# Altium PCB DB30.PcbDoc (part 7 of 8)
Units mil, origin at the board's own origin, x right, y up, seen from the top; angles counter-clockwise.
Board outline 3236.22 x 4456.69 mil, 8 copper layers (Top Layer, MidLayer1, MidLayer2, GND-Layer5, MidLayer3, VCC, MidLayer4, Bottom Layer), stack 61.8 mil thick; 219 components, 472 nets, 1811 pads, 1561 vias.
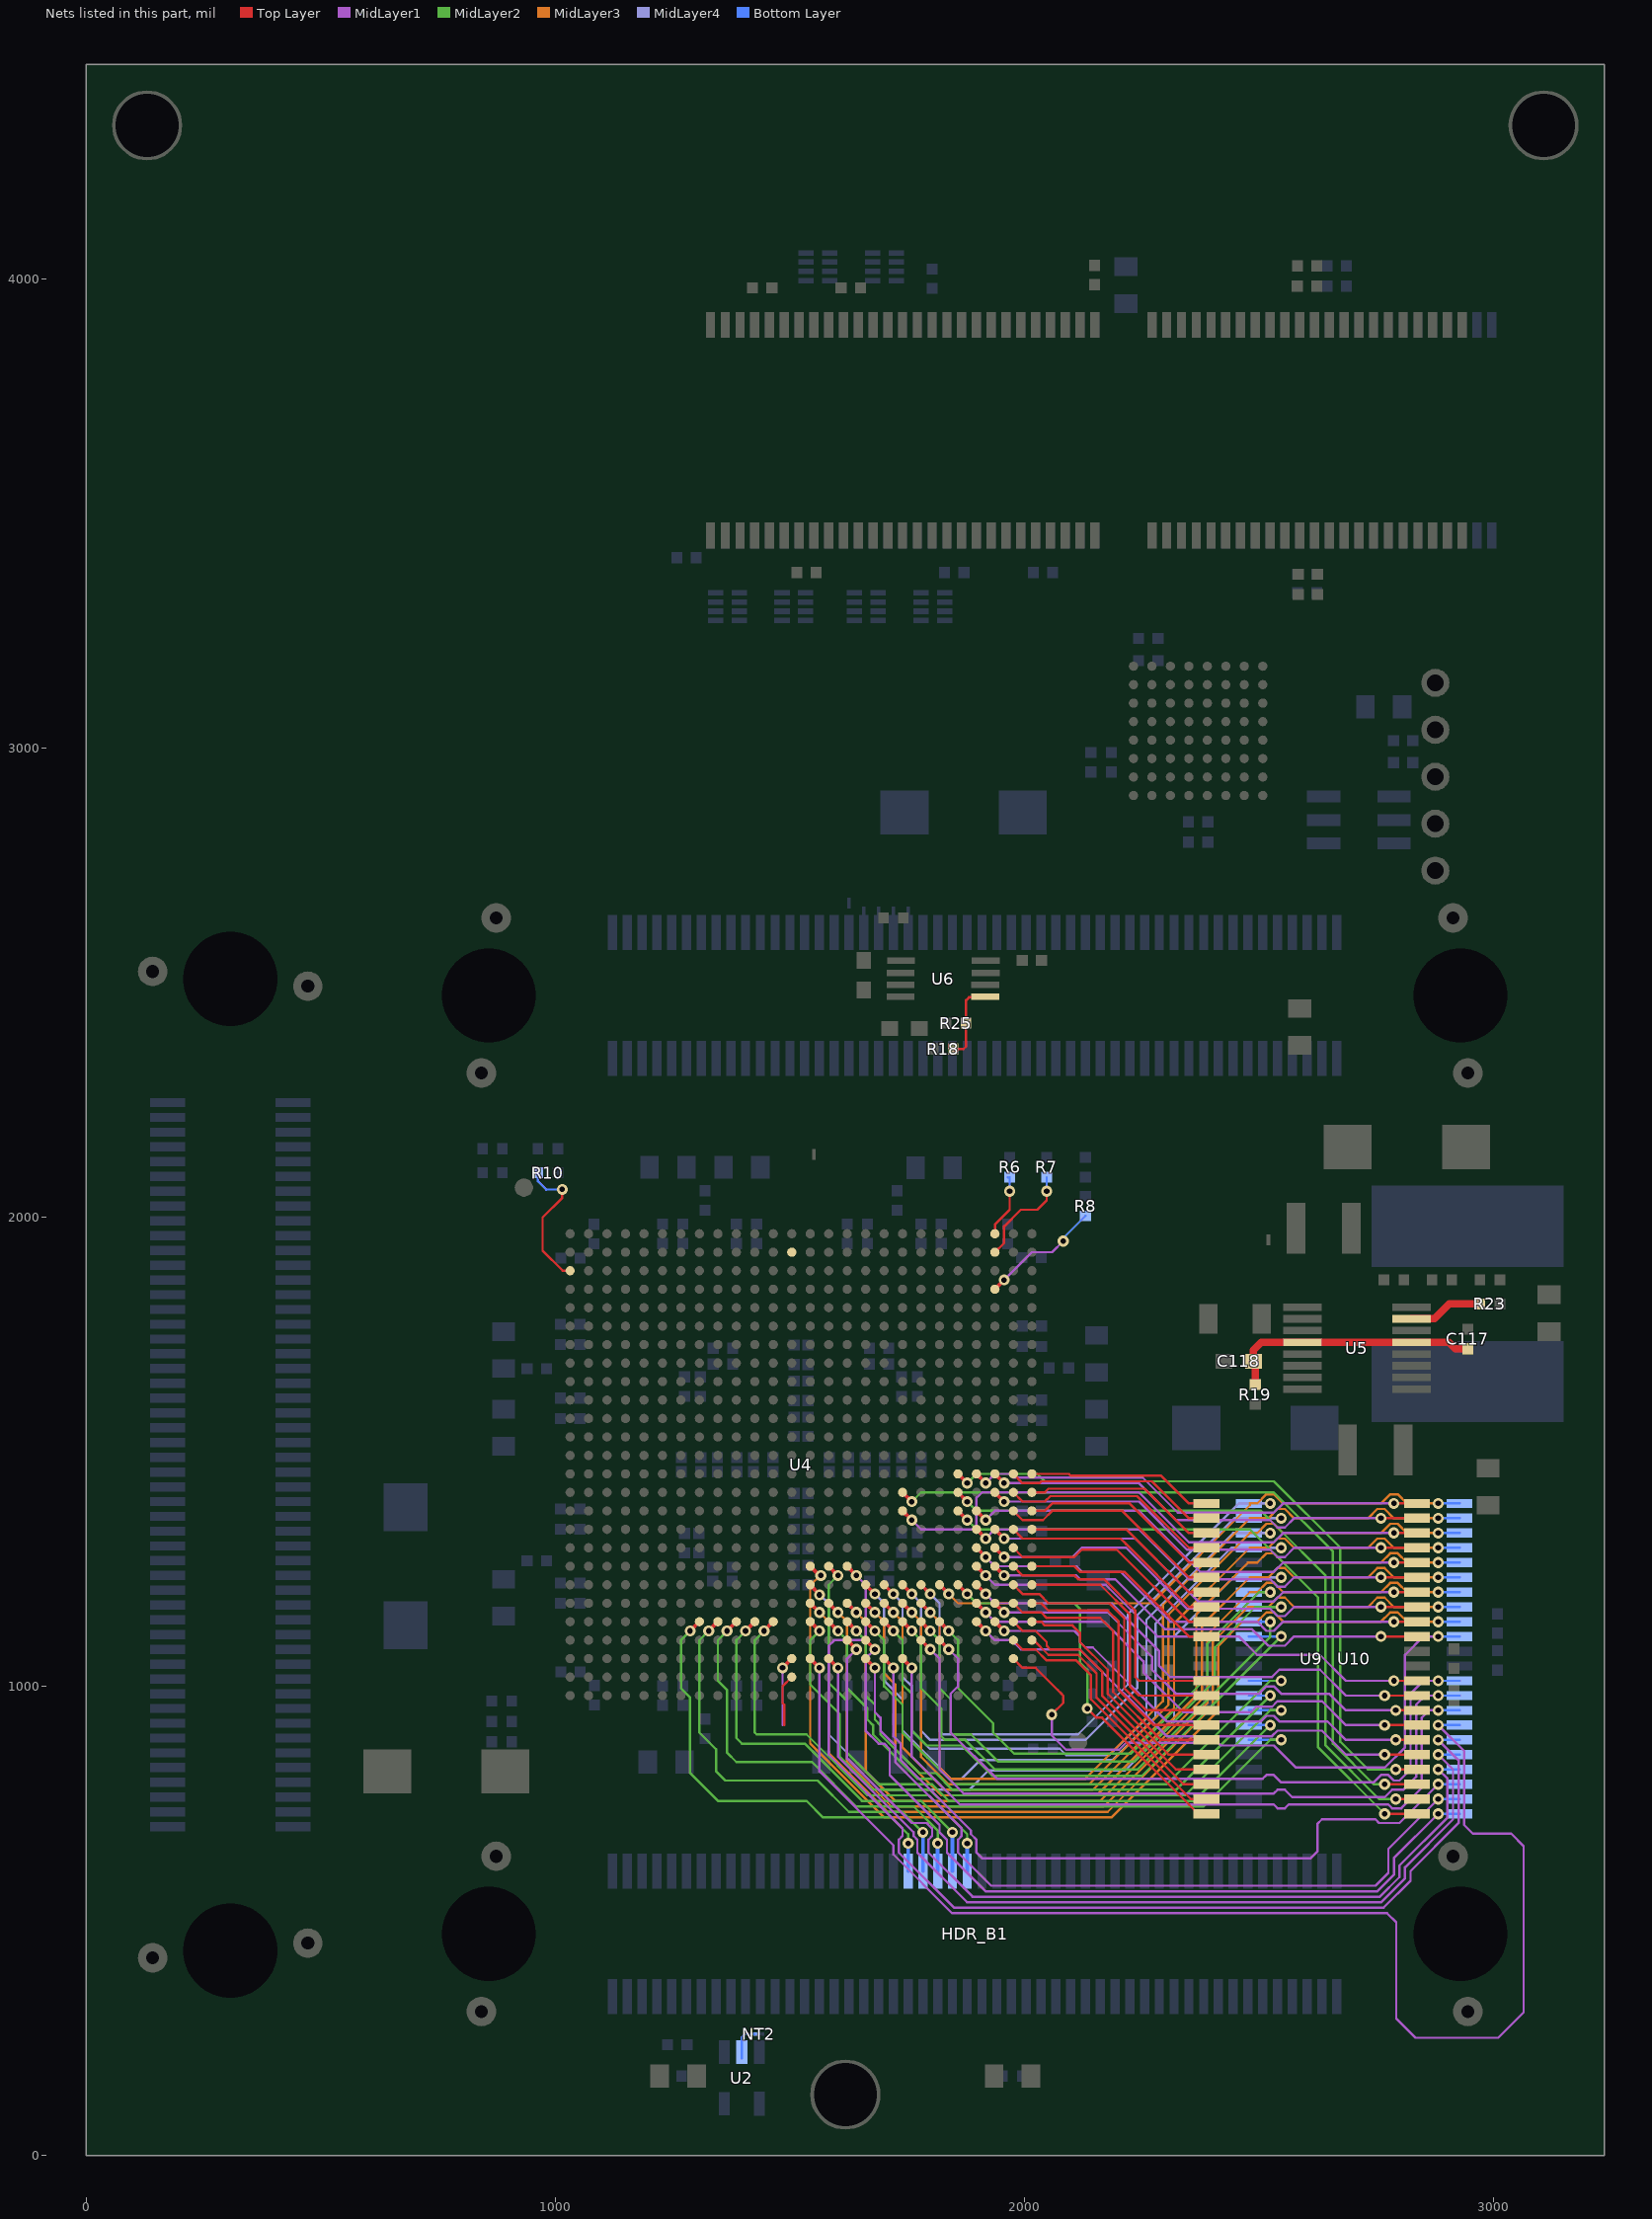
[diagram p13: the nets of this part, all layers, seen from the top]

## Via types
v1: diameter 23.62, hole 11.81, Top Layer to Bottom Layer, 944 vias
v2: diameter 23.62, hole 11.81, Top Layer to Bottom Layer, tented both sides, 477 vias
v3: diameter 27.56, hole 15.75, Top Layer to Bottom Layer, 139 vias
v4: diameter 23.62, hole 11.81, Top Layer to Bottom Layer, tented top, 1 vias

## Nets (pads, with @x,y where several pads share a name; then routed paths per layer and width w, separated by ;. In a path a pad name is that pad's centre, name@x,y a point inside that pad or via, vN(x,y) a via of type N, cw(c..) or ccw(c..) an arc to the next point about the centre after c; other vN are vias at no path point) (continued)
SRAM1_A6: U4.Y17 U10.19 | length 1586.2
  Top Layer w7.87: U4.Y17@1661.42,1216.54 v1(1681.1,1196.85)
  MidLayer4 w5: v1(1681.1,1196.85) 1700.79,1177.16 1700.79,1011.81 1740.16,972.44 1740.16,917.32 1740.16,905.51 1842.52,803.15 1866.14,803.15 1905.51,842.52 2187.01,842.52 2279.53,935.04 2279.53,1133.86 2440.94,1295.28 v1(2547.24,1295.28)
  Bottom Layer w5: U10.19@2478.44,1295.27 v1(2547.24,1295.28) v1@2551.18,1295.28
SRAM1_A7: U4.Y18 U10.20 | length 1489.3
  Top Layer w7.87: U4.Y18@1700.79,1216.54 v1(1720.47,1196.85)
  MidLayer4 w5: v1(1720.47,1196.85) 1740.16,1177.16 1740.16,1019.69 1759.84,1000 1759.84,917.32 1759.84,905.51 1798.23,867.13 2075.05,867.13 2088.83,853.35 2181.1,853.35 2259.84,932.09 2259.84,1141.73 2444.88,1326.77 2456.69,1326.77 v1(2523.83,1326.76)
  Bottom Layer w5: U10.20@2478.44,1326.76 v1@2527.77,1326.76
SRAM1_A8: U4.Y19 U10.21 | length 1468.5
  Top Layer w7.87: U4.Y19@1740.16,1216.54 v1(1759.84,1196.85)
  MidLayer4 w5: v1(1759.84,1196.85) 1779.53,1177.16 1779.53,917.32 1779.53,905.51 1799.21,885.83 2129.92,885.83 2240.16,996.06 2240.16,1151.21 2447.21,1358.27 v1(2547.24,1358.27)
  Bottom Layer w5: U10.21@2472.44,1358.27 U10.21@2478.44,1358.26 v1(2547.24,1358.27) v1@2551.18,1358.27
SRAM1_A9: U4.Y20 U10.22 | length 1372.4
  Top Layer w7.87: U4.Y20@1779.53,1216.54 v1(1799.21,1196.85)
  MidLayer4 w5: v1(1799.21,1196.85) 1818.9,1177.16 1818.9,917.32 1818.9,905.51 1826.77,897.64 2114.17,897.64 2220.47,1003.94 2220.47,1153.54 2456.68,1389.75 v1(2523.83,1389.75)
  Bottom Layer w5: U10.22@2478.44,1389.75 v1(2523.83,1389.75)
SRAM1_A10: U4.Y21 U10.23 | length 1247.9
  Top Layer w7.87: U4.Y21@1818.9,1216.54 v1(1838.58,1196.85)
  MidLayer3 w5: v1(1838.58,1196.85) 1858.27,1177.16 2078.74,1177.17 2094.49,1177.17 2271.65,1177.17 2480.33,1385.84 2480.33,1389.75 2496.27,1389.75 2515.96,1409.44 2531.7,1409.44 2551.38,1389.76 ; 2551.18,1389.76 2551.38,1389.76 ; v1(2881.9,1389.75) 2814.97,1389.75 2795.28,1409.45 2779.53,1409.45 2759.84,1389.76 2551.38,1389.76
  Bottom Layer w5: v1(2881.9,1389.75) U10.23@2927.25,1389.75
SRAM1_A11: U4.AA20 U10.24 | length 1867.3
  Top Layer w7.87: U4.AA20@1779.53,1177.17 v1(1799.21,1157.48)
  MidLayer3 w5: v1(1799.21,1157.48) 1818.9,1137.79 1818.9,917.32 1818.9,905.51 1818.9,826.77 1842.52,803.15 2129.92,803.15 2295.28,968.5 2295.28,1173.23 2480.31,1358.27 2519.69,1358.27 2539.37,1377.95 2555.12,1377.95 2574.8,1358.27 2732.28,1358.27 2751.97,1377.95 2767.72,1377.95 2787.41,1358.26 v1(2881.9,1358.26)
  Bottom Layer w5: v1(2881.9,1358.26) U10.24@2927.25,1358.26
SRAM1_A12: U4.AA19 U10.25 | length 1883.2
  Top Layer w7.87: U4.AA19@1740.16,1177.17 v1(1759.84,1157.48)
  MidLayer3 w5: v1(1759.84,1157.48) 1779.53,1137.79 1779.53,917.32 1779.53,905.51 1779.53,849.41 1837.6,791.34 2137.8,791.34 2307.09,960.63 2307.09,1153.52 2480.33,1326.76 2496.27,1326.76 2515.96,1346.45 2531.7,1346.45 2551.38,1326.77 2759.84,1326.77 2779.53,1346.46 2795.28,1346.46 2814.97,1326.76 v1(2881.9,1326.76)
  Bottom Layer w5: v1(2881.9,1326.76) U10.25@2927.25,1326.76
SRAM1_A13: U4.AA18 U10.26 | length 1900.3
  Top Layer w7.87: U4.AA18@1700.79,1177.17 v1(1720.47,1157.48)
  MidLayer3 w5: v1(1720.47,1157.48) 1740.16,1137.79 1740.16,917.32 1740.16,905.51 1740.16,870.08 1830.71,779.53 2145.67,779.53 2318.9,952.76 2318.9,1133.86 2480.31,1295.28 2519.69,1295.28 2539.37,1314.96 2555.12,1314.96 2574.8,1295.28 2732.28,1295.28 2751.97,1314.96 2767.72,1314.96 2787.41,1295.27 v1(2881.9,1295.27)
  Bottom Layer w5: v1(2881.9,1295.27) U10.26@2927.25,1295.27
SRAM1_A14: U4.AA17 U10.27 | length 1920.3
  Top Layer w7.87: U4.AA17@1661.42,1177.17 v1(1681.1,1157.48)
  MidLayer3 w5: v1(1681.1,1157.48) 1700.79,1137.79 1700.79,1027.56 1724.41,1003.94 1724.41,917.32 1724.41,905.51 1724.41,866.14 1822.83,767.72 2153.54,767.72 2366.14,980.31 2366.14,1153.54 2476.37,1263.77 2496.27,1263.77 2515.96,1283.45 2531.7,1283.45 2551.38,1263.78 2759.84,1263.78 2779.53,1283.46 2795.28,1283.46 2814.97,1263.77 v1(2881.9,1263.77)
  Bottom Layer w5: v1(2881.9,1263.77) U10.27@2927.25,1263.77
SRAM1_A15: U4.AD18 U10.42 | length 1635.8
  Top Layer w7.87: U4.AD18@1700.79,1059.05 v1(1720.47,1039.37)
  MidLayer1 w5: v1(1720.47,1039.37) 1720.47,917.32 1720.47,905.51 1720.47,893.7 1736.22,877.95 1736.22,842.52 1885.83,692.91 1885.83,685.04 1897.64,673.23 1897.64,645.67 1909.45,633.86 2610.24,633.86 2624.26,647.88 2624.26,706.94 2633.86,716.54 2748.03,716.54 2755.91,708.66 2799.21,708.66 v1(2881.9,791.33)
  Bottom Layer w5: v1(2881.9,791.33) U10.42@2927.25,791.33
SRAM1_A16: U4.AD17 U10.43 | length 1706.2
  Top Layer w7.87: U4.AD17@1661.42,1059.05 v1(1681.1,1039.37)
  MidLayer1 w5: v1(1681.1,1039.37) 1681.1,944.88 1692.91,933.07 1692.91,917.32 1692.91,905.51 1724.41,874.02 1724.41,838.58 1866.14,696.85 1866.14,681.1 1858.27,673.23 1858.27,645.67 1928.89,575.05 2748.28,575.05 2775.59,602.36 2775.59,653.54 v1(2881.9,759.83)
  Bottom Layer w5: v1(2881.9,759.83) U10.43@2927.25,759.83
SRAM1_A17: U4.AC17 U10.44 | length 1763.6
  Top Layer w7.87: U4.AC17@1661.42,1098.43 v1(1681.1,1078.74)
  MidLayer1 w5: v1(1681.1,1078.74) 1661.42,1059.05 1661.42,917.32 1661.42,905.51 1688.98,877.95 1700.79,877.95 1712.6,866.14 1712.6,811.02 1818.9,704.72 1818.9,688.98 1834.65,673.23 1834.65,645.67 1917.08,563.24 2752.21,563.24 2787.4,598.43 2787.4,633.86 v1(2881.9,728.34)
  Bottom Layer w5: v1(2881.9,728.34) U10.44@2927.25,728.34
SRAM1_A18: U4.AA16 U10.28 | length 1988.7
  Top Layer w7.87: U4.AA16@1622.05,1177.17 v1(1641.73,1157.48)
  MidLayer3 w5: v1(1641.73,1157.48) 1661.42,1137.79 1661.42,917.32 1661.42,905.51 1661.42,818.9 1724.41,755.91 2161.42,755.91 2377.95,972.44 2377.95,1129.92 2480.31,1232.28 2519.69,1232.28 2539.37,1251.97 2555.12,1251.97 2574.8,1232.28 2732.28,1232.28 2751.97,1251.97 2767.72,1251.97 2787.41,1232.28 v1(2881.9,1232.27)
  Bottom Layer w5: v1(2881.9,1232.27) U10.28@2927.25,1232.27
SRAM1_D0: U4.W15 U10.7 | length 1490.6
  Top Layer w7.87: U4.W15@1582.68,1255.91 v1(1602.36,1236.22)
  MidLayer2 w5: v1(1602.36,1236.22) 1582.68,1216.54 1582.68,1019.68 1582.68,1007.87 1622.05,968.5 1622.05,917.32 1622.05,905.51 1622.05,858.27 1688.98,791.34 1803.15,791.34 1838.58,755.91 2362.2,755.91 2523.6,917.3 v1(2523.83,917.3)
  Bottom Layer w5: U10.7@2478.44,917.31 v1(2523.83,917.3) v1@2527.77,917.3
SRAM1_D1: U4.AB15 U10.8 | length 1351
  Top Layer w7.87: U4.AB15@1582.68,1137.8 v1(1602.36,1118.11)
  MidLayer2 w5: v1(1602.36,1118.11) 1622.05,1098.42 1622.05,996.06 1665.35,952.76 1665.35,929.13 1677.17,917.32 1677.17,905.51 1677.17,897.64 1771.65,803.15 1807.09,803.15 1834.65,775.59 1842.52,767.72 2342.52,767.72 2523.62,948.82 v1(2547.24,948.82)
  Bottom Layer w5: U10.8@2478.44,948.81 v1(2547.24,948.82) v1@2551.18,948.82
SRAM1_D2: U4.AB16 U10.9 | length 1282.1
  Top Layer w7.87: U4.AB16@1622.05,1137.8 v1(1641.73,1118.11)
  MidLayer2 w5: v1(1641.73,1118.11) 1661.42,1098.42 1661.42,980.32 1681.1,960.63 1681.1,929.13 1692.91,917.32 1692.91,905.51 1692.91,897.64 1775.59,814.96 1811.02,814.96 1846.46,779.53 2323.05,779.53 v1(2523.83,980.31) v1@2523.61,980.31
  Bottom Layer w5: U10.9@2478.44,980.31 v1(2523.83,980.31) v1@2527.77,980.31
SRAM1_D3: U4.AB17 U10.10 | length 1285.7
  Top Layer w7.87: U4.AB17@1661.42,1137.8 v1(1681.1,1118.11)
  MidLayer2 w5: v1(1681.1,1118.11) 1700.79,1098.42 1700.79,1000 1740.16,960.63 1740.16,917.32 1740.16,905.51 1740.16,901.57 1850.39,791.34 2303.15,791.34 2523.62,1011.81 v1(2547.24,1011.81)
  Bottom Layer w5: U10.10@2478.44,1011.8 v1(2547.24,1011.81) v1@2551.18,1011.81
SRAM1_D4: U4.AB18 U10.13 | length 1280
  Top Layer w7.87: U4.AB18@1700.79,1137.8 v1(1720.47,1118.11)
  MidLayer2 w5: v1(1720.47,1118.11) 1740.16,1098.42 1740.16,1003.94 1759.84,984.25 1759.84,917.32 1759.84,905.51 1791.34,874.02 1866.14,874.02 1931.1,809.06 2250,809.06 v1(2547.24,1106.3)
  Bottom Layer w5: U10.13@2478.44,1106.29 v1(2547.24,1106.3) v1@2551.18,1106.3
SRAM1_D5: U4.AB19 U10.14 | length 1207.4
  Top Layer w7.87: U4.AB19@1740.16,1137.8 v1(1759.84,1118.11)
  MidLayer2 w5: v1(1759.84,1118.11) 1779.53,1098.42 1779.53,996.06 1822.83,952.76 1822.83,917.32 1822.83,905.51 1822.83,893.7 1830.71,885.83 1874.02,885.83 1937.01,822.83 2241.14,822.83 2523.83,1105.52 v1(2523.83,1137.79)
  Bottom Layer w5: U10.14@2478.44,1137.79 v1@2527.77,1137.79
SRAM1_D6: U4.AB20 U10.15 | length 1243.6
  Top Layer w7.87: U4.AB20@1779.53,1137.8 v1(1799.21,1118.11)
  MidLayer2 w5: v1(1799.21,1118.11) 1818.9,1098.42 1818.9,996.06 1842.52,972.44 1842.52,917.32 1842.52,905.51 1842.52,901.57 1846.46,897.64 1885.83,897.64 1905.51,877.95 1943.9,839.57 2233.27,839.57 2405.51,1011.81 2405.51,1082.68 2492.13,1169.29 v1(2547.24,1169.29)
  Bottom Layer w5: U10.15@2478.44,1169.28 v1(2547.24,1169.29) v1@2551.18,1169.29
SRAM1_D7: U4.AB21 U10.16 | length 1126.6
  Top Layer w7.87: U4.AB21@1818.9,1137.8 v1(1838.58,1118.11)
  MidLayer2 w5: v1(1838.58,1118.11) 1858.27,1098.42 1858.27,996.06 1933.07,921.26 1933.07,917.32 1933.07,905.51 1933.07,901.57 1978.35,856.3 2226.38,856.3 2389.76,1019.69 2389.76,1090.55 2500,1200.79 v1@2523.83,1200.79
  Bottom Layer w5: U10.16@2478.44,1200.78 v1@2527.77,1200.78
  other v1: 2523.83,1200.78
SRAM1_D8: U4.AA15 U10.29 | length 2006.3
  Top Layer w7.87: U4.AA15@1582.68,1177.17 v1(1602.36,1157.48)
  MidLayer3 w5: v1(1602.36,1157.48) 1622.05,1137.79 1622.05,917.32 1622.05,905.51 1622.05,838.58 1716.54,744.09 2169.29,744.09 2389.76,964.57 2389.76,1110.24 2480.3,1200.78 2496.27,1200.78 2515.96,1220.46 2531.7,1220.46 2551.38,1200.79 2759.84,1200.79 2779.53,1220.47 2795.28,1220.47 2814.97,1200.78 v1(2881.9,1200.78)
  Bottom Layer w5: v1(2881.9,1200.78) U10.29@2927.25,1200.78
SRAM1_D9: U4.AA14 U10.30 | length 2026.3
  Top Layer w7.87: U4.AA14@1543.31,1177.17 v1(1562.99,1157.48)
  MidLayer3 w5: v1(1562.99,1157.48) 1582.68,1137.79 1582.68,917.32 1582.68,905.51 1582.68,858.27 1708.66,732.28 2177.17,732.28 2401.57,956.69 2401.57,1094.49 2476.38,1169.29 2519.69,1169.29 2539.37,1188.98 2555.12,1188.98 2574.8,1169.29 2732.28,1169.29 2751.97,1188.98 2767.72,1188.98 2787.41,1169.29 v1(2881.9,1169.28)
  Bottom Layer w5: v1(2881.9,1169.28) U10.30@2927.25,1169.28
SRAM1_D10: U4.W14 U10.31 | length 2131.8
  Top Layer w7.87: U4.W14@1543.31,1255.91 v1@1562.99,1236.22
  MidLayer3 w5: v1(1565.94,1236.22) 1543.31,1216.54 1543.31,917.32 1543.31,905.51 1543.31,877.95 1700.79,720.47 2185.04,720.47 2413.39,948.82 2413.39,1086.61 2464.56,1137.79 2496.27,1137.79 2515.96,1157.47 2531.7,1157.47 2551.38,1137.8 2759.84,1137.8 2779.53,1157.48 2795.28,1157.48 2814.97,1137.79 v1(2881.9,1137.79)
  Bottom Layer w5: v1(2881.9,1137.79) U10.31@2927.25,1137.79
SRAM1_D11: U4.AD25 U10.32 | length 1379.1
  Top Layer w5: U4.AD25@1976.38,1059.05 1996.06,1039.37 2023.62,1039.37 2070.87,992.13 2078.74,984.25 2082.68,980.32 2082.68,964.57 v1(2058.07,939.96)
  MidLayer1 w5: v1(2058.07,939.96) 2058.07,895.67 2088.58,865.16 2201.53,865.16 2216.29,879.92 2412.65,879.92 2418.55,874.02 2531.5,874.02 2578.75,826.76 2767.71,826.76 2811.02,870.08 2811.02,1066.93 2850.39,1106.3 2862.59,1106.3 ; 2858.28,1106.29 v1(2881.9,1106.29)
  Bottom Layer w5: v1(2881.9,1106.29) U10.32@2927.25,1106.29
SRAM1_D12: U4.AC21 U10.35 | length 1549
  Top Layer w7.87: U4.AC21@1818.9,1098.43 v1(1838.58,1078.74)
  MidLayer1 w5: v1(1838.58,1078.74) 1858.27,1059.05 1858.27,1000 1842.52,984.25 1842.52,917.32 1842.52,905.51 1842.52,901.57 1940.94,803.15 2507.87,803.15 2515.75,811.02 2531.5,811.02 2547.24,795.28 2744.09,795.27 2759.84,811.02 2775.6,811.02 2787.4,799.21 2799.21,799.21 2822.83,822.83 2822.83,984.25 2850.39,1011.81 2862.2,1011.81 ; 2862.21,1011.8 v1(2881.9,1011.8)
  Bottom Layer w5: v1(2881.9,1011.8) U10.35@2927.25,1011.8
SRAM1_D13: U4.AC20 U10.36 | length 1610.9
  Top Layer w7.87: U4.AC20@1779.53,1098.43 v1(1799.21,1078.74)
  MidLayer1 w5: v1(1799.21,1078.74) 1818.9,1059.05 1818.9,917.32 1818.9,905.51 1818.9,822.83 1870.08,771.65 2531.5,771.65 2539.37,779.53 2555.12,779.53 2570.87,763.78 2767.71,763.77 2783.46,779.52 2807.08,779.52 2834.65,807.09 2834.65,960.63 2854.33,980.32 2862.2,980.32 v1(2881.9,980.31)
  Bottom Layer w5: v1(2881.9,980.31) U10.36@2927.25,980.31
SRAM1_D14: U4.AD19 U10.37 | length 1610.5
  Top Layer w7.87: U4.AD19@1740.16,1059.05 v1(1759.84,1039.37)
  MidLayer1 w5: v1(1759.84,1039.37) 1759.84,917.32 1759.84,905.51 1759.84,850.39 1862.2,748.03 2531.5,748.03 2539.37,740.16 2555.12,740.16 2562.99,748.03 2775.59,748.03 2783.46,740.16 2803.15,740.16 2846.46,783.46 2846.46,933.07 2862.2,948.82 v1(2881.9,948.81)
  Bottom Layer w5: v1(2881.9,948.81) U10.37@2927.25,948.81
SRAM1_D15: U4.AD14 U10.38 | length 2919.2
  Top Layer w7.87: U4.AD14@1543.31,1059.05 v1(1562.99,1039.37)
  MidLayer1 w5: v1(1562.99,1039.37) 1562.99,917.32 1562.99,905.51 1562.99,818.9 1720.47,661.42 1720.47,641.73 1845.47,516.73 2772.64,516.73 2792.32,497.05 2792.32,292.32 2833.66,250.98 3009.84,250.98 3063.98,305.12 3063.98,659.45 3037.4,686.02 2955.71,686.02 2937.01,704.72 2937.01,862.2 v1(2881.9,917.31)
  Bottom Layer w5: v1(2881.9,917.31) U10.38@2927.25,917.31
SRAM1_NBHE: U4.AD15 U10.40 | length 1960.2
  Top Layer w7.87: U4.AD15@1582.68,1059.05 v1(1602.36,1039.37)
  MidLayer1 w5: v1(1602.36,1039.37) 1602.36,917.32 1602.36,905.51 1602.36,850.39 1763.78,688.98 1763.78,681.1 1771.65,673.23 1771.65,645.67 1877.21,540.11 2760.58,540.11 2811.02,590.55 2811.02,614.17 2913.39,716.54 2913.39,822.83 v1(2881.9,854.32)
  Bottom Layer w5: v1(2881.9,854.32) U10.40@2927.25,854.32
SRAM1_NBLE: U4.W16 U10.39 | length 2330.8
  Top Layer w7.87: U4.W16@1622.05,1255.91 v1(1641.73,1236.22)
  MidLayer1 w5: v1(1641.73,1236.22) 1661.42,1216.53 1661.42,1106.3 1653.54,1098.43 1594.49,1098.43 1582.68,1086.61 1582.68,952.76 1582.68,917.32 1582.68,905.51 1582.68,854.33 1740.16,696.85 1740.16,681.1 1732.28,673.23 1732.28,645.67 1849.41,528.54 2765.75,528.54 2822.83,585.63 2822.83,606.3 2925.2,708.66 2925.2,842.52 v1(2881.9,885.82)
  Bottom Layer w5: v1(2881.9,885.82) U10.39@2927.25,885.82
SRAM1_NCS: U4.AB14 U10.6 | length 1446.2
  Top Layer w7.87: U4.AB14@1543.31,1137.8 v1(1562.99,1118.11)
  MidLayer2 w5: v1(1562.99,1118.11) 1543.31,1098.42 1543.31,1003.94 1606.3,940.94 1606.3,917.32 1606.3,905.51 1606.3,850.39 1677.17,779.53 1799.21,779.53 1834.65,744.09 2381.89,744.09 2523.62,885.83 v1(2547.24,885.83)
  Bottom Layer w5: U10.6@2478.44,885.82 v1(2547.24,885.83) v1@2551.18,885.83
SRAM1_NOE: U4.AC16 U10.41 | length 1951.2
  Top Layer w7.87: U4.AC16@1622.05,1098.43 v1(1641.73,1078.74)
  MidLayer1 w5: v1(1641.73,1078.74) 1622.05,1059.05 1622.05,917.32 1622.05,905.51 1622.05,846.46 1759.84,708.66 1791.34,708.66 1799.21,700.79 1803.15,696.85 1803.15,681.1 1795.28,673.23 1795.28,645.67 1889.27,551.67 2757.38,551.67 2799.21,593.5 2799.21,618.11 2901.57,720.47 2901.57,803.15 v1(2881.9,822.83)
  Bottom Layer w5: v1(2881.9,822.83) U10.41@2927.25,822.83
SRAM1_NWE: U4.Y14 U10.17 | length 1715.1
  Top Layer w7.87: U4.Y14@1543.31,1216.54 v1(1562.99,1194.88)
  MidLayer4 w5: v1(1562.99,1194.88) 1582.68,1177.16 1582.68,917.32 1582.68,905.51 1582.68,897.64 1700.79,779.53 1881.89,779.53 1923.23,820.87 2214.57,820.87 2318.9,925.2 2318.9,1106.3 2444.88,1232.28 v1(2547.24,1232.28)
  Bottom Layer w5: U10.17@2478.44,1232.28 v1(2547.24,1232.28) v1@2551.18,1232.28
SRAM2_A0: U4.T22 U9.1 | length 1432.7
  Top Layer w5: v1(2767.69,728.34) U9.1@2836.71,728.34
  Top Layer w7.87: U4.T22@1858.27,1374.02 v1(1877.95,1354.33)
  MidLayer2 w5: v1(1877.95,1354.33) 1897.64,1334.65 2078.74,1334.65 2094.49,1334.65 2480.31,1334.65 2625.98,1188.98 2625.98,870.08 v1(2767.69,728.34)
SRAM2_A1: U4.R22 U9.2 | length 1461.3
  Top Layer w5: v1(2791.34,759.84) U9.2@2836.71,759.83
  Top Layer w7.87: U4.R22@1858.27,1413.39 v1(1877.95,1393.7)
  MidLayer2 w5: v1(1877.95,1393.7) 1897.64,1374.02 2078.74,1374.02 2094.49,1374.02 2503.94,1374.02 2539.37,1338.58 2641.73,1236.22 2641.73,874.02 2755.91,759.84 v1(2791.34,759.84)
SRAM2_A2: U4.R19 U9.3 | length 1610.4
  Top Layer w5: v1(2767.69,791.34) U9.3@2836.71,791.33
  Top Layer w7.87: U4.R19@1740.16,1413.39 v1(1759.84,1393.7)
  MidLayer2 w5: v1(1759.84,1393.7) 1779.53,1413.38 2078.74,1413.39 2094.49,1413.39 2531.5,1413.39 2657.48,1287.4 2657.48,877.95 2744.1,791.34 v1(2767.69,791.34)
SRAM2_A3: U4.P22 U9.4 | length 1497.8
  Top Layer w5: v1(2791.34,822.83) U9.4@2836.71,822.83
  Top Layer w7.87: U4.P22@1858.27,1452.76 v1(1877.95,1433.07)
  MidLayer2 w5: v1(1877.95,1433.07) 1897.64,1452.76 2027.56,1452.76 2043.31,1437.01 2078.74,1437.01 2094.49,1437.01 2531.5,1437.01 2673.23,1295.28 2673.23,881.89 2732.28,822.83 v1(2791.34,822.83)
SRAM2_A4: U4.AB23 U9.5 | length 1058.4
  Top Layer w5: v1(2767.69,854.33) U9.5@2836.71,854.32
  Top Layer w7.87: U4.AB23@1897.64,1137.8 v1(1917.32,1118.11)
  MidLayer1 w5: v1(1917.32,1118.11) 1937.01,1098.43 1972.44,1098.43 1992.13,1078.74 2078.74,1078.74 2094.49,1078.74 2118.11,1078.74 2303.15,893.7 2527.56,893.7 2539.37,905.51 2633.86,905.51 2685.04,854.33 v1@2759.84,854.31
SRAM2_A5: U4.T23 U9.18 | length 1017.4
  Top Layer w5: v1@2787.4,1263.77 U9.18@2836.71,1263.77
  Top Layer w7.87: U4.T23@1897.64,1374.02 v1(1917.32,1354.33)
  MidLayer1 w5: v1(1917.32,1354.33) 1937.01,1374.01 2078.74,1374.01 2094.49,1374.02 2244.09,1374.02 2374.02,1244.09 2531.5,1244.09 2551.18,1263.78 v1(2787.4,1263.78)
SRAM2_A6: U4.R24 U9.19 | length 964.9
  Top Layer w5: v1(2759.84,1295.28) U9.19@2836.71,1295.27
  Top Layer w7.87: U4.R24@1937.01,1413.39 v1(1956.69,1393.7)
  MidLayer1 w5: v1(1956.69,1393.7) 2078.74,1393.7 2094.49,1393.7 2244.09,1393.7 2346.46,1291.34 2523.62,1291.34 2539.37,1275.59 2555.12,1275.59 2574.8,1295.28 v1(2759.84,1295.28)
SRAM2_A7: U4.T19 U9.20 | length 1232.3
  Top Layer w5: v1(2787.4,1326.77) U9.20@2836.71,1326.76
  Top Layer w7.87: U4.T19@1740.16,1374.02 v1(1759.84,1354.33)
  MidLayer1 w5: v1(1759.84,1354.33) 1779.53,1334.65 1889.76,1334.65 1897.64,1342.52 1897.64,1401.57 1909.45,1413.39 2043.31,1413.39 2078.74,1413.39 2094.49,1413.39 2244.09,1413.39 2350.39,1307.09 2531.5,1307.09 2551.18,1326.77 v1(2787.4,1326.77)
SRAM2_A8: U4.P24 U9.21 | length 955.1
  Top Layer w5: v1(2759.84,1358.27) U9.21@2836.71,1358.26
  Top Layer w7.87: U4.P24@1937.01,1452.76 v1(1956.69,1433.07)
  MidLayer1 w5: v1(1956.69,1433.07) 2078.74,1433.07 2094.49,1433.07 2244.09,1433.07 2322.83,1354.33 2523.62,1354.33 2539.37,1338.58 2555.12,1338.58 2574.8,1358.27 v1(2759.84,1358.27)
SRAM2_A9: U4.P23 U9.22 | length 997.8
  Top Layer w5: v1(2787.4,1389.76) U9.22@2836.71,1389.76
  Top Layer w7.87: U4.P23@1897.64,1452.76 v1(1917.32,1433.07)
  MidLayer1 w5: v1(1917.32,1433.07) 1937.01,1452.76 1968.5,1452.76 1976.38,1444.88 2078.74,1444.88 2094.49,1444.88 2251.97,1444.88 2326.77,1370.08 2531.5,1370.08 2551.18,1389.76 v1(2787.4,1389.76)
SRAM2_A10: U4.P26 U9.23 | length 398.2
  Top Layer w5: U4.P26@2015.75,1452.76 2078.74,1452.76 2094.49,1452.76 2098.43,1448.82 2291.34,1448.82 2350.4,1389.76 U9.23@2387.89,1389.76
SRAM2_A11: U4.P25 U9.24 | length 453.9
  Top Layer w5: U4.P25@1976.38,1452.76 1996.06,1433.07 2031.5,1433.07 2035.43,1437.01 2078.74,1437.01 2094.49,1437.01 2271.65,1437.01 2350.4,1358.26 U9.24@2387.89,1358.26
SRAM2_A12: U4.R26 U9.25 | length 414.5
  Top Layer w5: U4.R26@2015.75,1413.39 2043.31,1413.39 2051.18,1421.26 2078.74,1421.26 2094.49,1421.26 2255.91,1421.26 2350.4,1326.76 U9.25@2387.89,1326.76
SRAM2_A13: U4.R25 U9.26 | length 470.2
  Top Layer w5: U4.R25@1976.38,1413.39 1996.06,1393.7 2043.31,1393.7 2055.12,1405.51 2078.74,1405.51 2094.49,1405.51 2240.16,1405.51 2350.4,1295.27 U9.26@2387.89,1295.27
SRAM2_A14: U4.T26 U9.27 | length 430.9
  Top Layer w5: U4.T26@2015.75,1374.02 2043.31,1374.02 2059.06,1389.76 2078.74,1389.76 2094.49,1389.76 2224.41,1389.76 2350.4,1263.77 U9.27@2387.89,1263.77
SRAM2_A15: U4.AC26 U9.42 | length 529.3
  Top Layer w5: U4.AC26@2015.75,1098.43 2019.69,1098.43 2051.18,1066.93 2078.74,1066.93 2090.55,1066.93 2114.17,1066.93 2153.54,1027.56 2153.54,976.38 2338.59,791.33 U9.42@2387.89,791.33
SRAM2_A16: U4.AC25 U9.43 | length 581.7
  Top Layer w5: U4.AC25@1976.38,1098.43 1996.06,1078.74 2023.62,1078.74 2047.24,1055.12 2078.74,1055.12 2090.55,1055.12 2110.24,1055.12 2141.73,1023.62 2141.73,972.44 2354.34,759.83 U9.43@2387.89,759.83
SRAM2_A17: U4.Y22 U9.44 | length 847.2
  Top Layer w5: v1(2133.86,952.76) 2153.54,933.07 2165.35,933.07 2370.09,728.34 U9.44@2387.89,728.34
  Top Layer w7.87: U4.Y22@1858.27,1216.54 v1(1877.95,1196.85)
  MidLayer2 w5: v1(1877.95,1196.85) 1897.64,1177.17 2078.74,1177.17 2094.49,1177.17 2106.3,1177.17 2118.11,1165.35 2118.11,1051.18 2133.86,1035.43 v1(2133.86,952.76)
SRAM2_A18: U4.T25 U9.28 | length 486.5
  Top Layer w5: U4.T25@1976.38,1374.02 1996.06,1354.33 2039.37,1354.33 2059.05,1374.02 2078.74,1374.02 2094.49,1374.02 2208.66,1374.02 2350.4,1232.28 U9.28@2387.89,1232.28
SRAM2_D0: U4.AA23 U9.7 | length 1072.4
  Top Layer w5: v1(2767.69,917.32) U9.7@2836.71,917.32
  Top Layer w7.87: U4.AA23@1897.64,1177.17 v1(1917.32,1157.48)
  MidLayer1 w5: v1(1917.32,1157.48) 1937.01,1137.8 2078.74,1137.8 2094.49,1137.8 2169.29,1137.8 2253.94,1053.15 2253.94,1029.53 2338.58,944.88 2482.35,944.88 2494.16,956.69 2527.58,956.69 2539.11,968.23 2539.11,968.5 2633.86,968.5 2685.06,917.3 v1@2759.84,917.3
SRAM2_D1: U4.AA24 U9.8 | length 1019.5
  Top Layer w5: v1(2791.34,948.82) U9.8@2836.71,948.81
  Top Layer w7.87: U4.AA24@1937.01,1177.17 v1(1956.69,1157.48)
  MidLayer1 w5: v1(1956.69,1157.48) 2078.74,1157.48 2094.49,1157.48 2177.17,1157.48 2271.65,1062.99 2271.65,1035.43 2322.83,984.25 2500,984.25 2515.75,1000 2531.5,1000 2547.24,984.25 2649.61,984.25 2685.04,948.83 v1@2787.41,948.83
SRAM2_D2: U4.Y23 U9.9 | length 1060.6
  Top Layer w5: v1(2767.69,980.31) U9.9@2836.71,980.31
  Top Layer w7.87: U4.Y23@1897.64,1216.54 v1(1917.32,1196.85)
  MidLayer1 w5: v1(1917.32,1196.85) 1937.01,1177.17 2031.5,1177.17 2078.74,1177.17 2094.49,1177.17 2185.04,1177.17 2286.43,1075.77 2286.43,1044.28 2311.02,1019.68 2527.56,1019.68 2543.31,1035.43 2629.92,1035.43 2685.04,980.32 ; 2685.04,980.29 v1@2759.84,980.29
SRAM2_D3: U4.W23 U9.10 | length 1040.2
  Top Layer w5: v1(2787.4,1011.81) U9.10@2836.71,1011.8
  Top Layer w7.87: U4.W23@1897.64,1255.91 v1(1917.32,1236.22)
  MidLayer1 w5: v1(1917.32,1236.22) 1937.01,1216.54 2078.74,1216.54 2094.49,1216.54 2173.23,1216.54 2283.46,1106.3 2456.69,1106.3 2496.06,1066.93 2629.92,1066.93 2685.03,1011.82 v1(2787.4,1011.81)
SRAM2_D4: U4.W24 U9.13 | length 978
  Top Layer w5: v1(2759.84,1106.3) U9.13@2836.71,1106.29
  Top Layer w7.87: U4.W24@1937.01,1255.91 v1(1956.69,1236.22)
  MidLayer1 w5: v1(1956.69,1236.22) 2078.74,1236.22 2094.49,1236.22 2110.24,1236.22 2118.11,1228.35 2192.91,1228.35 2299.21,1122.05 2484.25,1122.05 2519.68,1086.62 2555.11,1086.62 2574.79,1106.31 v1(2759.84,1106.3)
SRAM2_D5: U4.V23 U9.14 | length 1020.6
  Top Layer w5: v1(2787.4,1137.8) U9.14@2836.71,1137.79
  Top Layer w7.87: U4.V23@1897.64,1295.28 v1(1917.32,1275.59)
  MidLayer1 w5: v1(1917.32,1275.59) 1937.01,1255.91 2078.74,1255.91 2094.49,1255.91 2110.24,1255.91 2122.05,1244.09 2204.72,1244.09 2311.02,1137.8 2496.06,1137.8 2515.75,1118.11 2531.49,1118.11 2551.17,1137.8 ; 2551.17,1137.8 v1(2787.4,1137.8)
SRAM2_D6: U4.V24 U9.15 | length 984.5
  Top Layer w5: v1(2759.84,1169.29) U9.15@2836.71,1169.28
  Top Layer w7.87: U4.V24@1937.01,1295.28 v1(1956.69,1275.59)
  MidLayer1 w5: v1(1956.69,1275.59) 2078.74,1275.59 2094.49,1275.59 2102.36,1275.59 2122.05,1295.28 2216.54,1295.28 2346.45,1165.36 2523.61,1165.36 2539.36,1149.61 2555.11,1149.61 2574.79,1169.3 v1(2759.84,1169.29)
SRAM2_D7: U4.U24 U9.16 | length 971.4
  Top Layer w5: v1(2787.4,1200.79) U9.16@2836.71,1200.78
  Top Layer w7.87: U4.U24@1937.01,1334.65 v1(1956.69,1314.96)
  MidLayer1 w5: v1(1956.69,1314.96) 2078.74,1314.96 2094.49,1314.96 2236.22,1314.96 2370.08,1181.1 2531.49,1181.1 ; 2531.49,1181.11 2551.17,1200.8 ; 2551.17,1200.8 v1(2787.4,1200.79)
SRAM2_D8: U4.U26 U9.29 | length 427.6
  Top Layer w5: U4.U26@2015.75,1334.65 2078.74,1334.65 2094.49,1334.65 2216.54,1334.65 2350.4,1200.78 U9.29@2387.89,1200.78
SRAM2_D9: U4.U25 U9.30 | length 480
  Top Layer w5: U4.U25@1976.38,1334.65 1996.06,1314.96 2078.74,1314.96 2094.49,1314.96 2204.72,1314.96 2216.54,1303.15 2350.4,1169.28 U9.30@2387.89,1169.28
SRAM2_D10: U4.V25 U9.31 | length 489.8
  Top Layer w5: U4.V25@1976.38,1295.28 1996.06,1275.59 2078.74,1275.59 2094.49,1275.59 2106.3,1275.59 2122.05,1291.34 2196.85,1291.34 2350.4,1137.79 U9.31@2387.89,1137.79
SRAM2_D11: U4.W26 U9.32 | length 434.1
  Top Layer w5: U4.W26@2015.75,1255.91 2078.74,1255.91 2094.49,1255.91 2106.3,1255.91 2118.11,1244.09 2212.6,1244.09 2350.4,1106.29 U9.32@2387.89,1106.29
SRAM2_D12: U4.W25 U9.35 | length 595.6
  Top Layer w5: U4.W25@1976.38,1255.91 1996.06,1236.22 2078.74,1236.22 2094.49,1236.22 2106.3,1236.22 2114.17,1228.35 2169.29,1228.35 2236.22,1161.42 2236.22,1019.68 2244.1,1011.8 U9.35@2387.89,1011.8
SRAM2_D13: U4.Y26 U9.36 | length 559.9
  Top Layer w5: U4.Y26@2015.75,1216.54 2078.74,1216.54 2094.49,1216.54 2161.42,1216.54 2224.41,1153.54 2224.41,1000 2244.1,980.31 U9.36@2387.89,980.31
SRAM2_D14: U4.Y25 U9.37 | length 610
  Top Layer w5: U4.Y25@1976.38,1216.54 1996.06,1196.85 2031.5,1196.85 2051.18,1177.17 2078.74,1177.17 2094.49,1177.17 2181.1,1177.17 2212.6,1145.67 2212.6,996.06 2259.85,948.81 U9.37@2387.89,948.81
SRAM2_D15: U4.AA26 U9.38 | length 565.1
  Top Layer w5: U4.AA26@2015.75,1177.17 2035.43,1177.17 2051.18,1161.42 2078.74,1161.42 2094.49,1161.42 2177.17,1161.42 2200.79,1137.8 2200.79,992.13 2275.6,917.32 U9.38@2387.89,917.32
SRAM2_NBHE: U4.AB26 U9.40 | length 531.1
  Top Layer w5: U4.AB26@2015.75,1137.8 2035.43,1137.8 2043.31,1129.92 2078.74,1129.92 2094.49,1129.92 2102.36,1129.92 2118.11,1114.17 2118.11,1094.49 2177.17,1035.43 2177.17,984.25 2307.09,854.32 U9.40@2387.89,854.32
SRAM2_NBLE: U4.AA25 U9.39 | length 608.3
  Top Layer w5: U4.AA25@1976.38,1177.17 1996.06,1157.48 2000,1157.48 2031.5,1157.48 2035.43,1157.48 2047.24,1145.67 2078.74,1145.67 2094.49,1145.67 2161.42,1145.67 2188.98,1118.11 2188.98,988.19 2291.35,885.82 U9.39@2387.89,885.82
SRAM2_NCS: U4.AB24 U9.6 | length 1016.8
  Top Layer w5: v1(2791.34,885.83) U9.6@2836.71,885.82
  Top Layer w7.87: U4.AB24@1937.01,1137.8 v1(1956.69,1118.11)
  MidLayer1 w5: v1(1956.69,1118.11) 2078.74,1118.11 2094.49,1118.11 2106.3,1118.11 2118.11,1106.3 2118.11,1094.49 2129.92,1082.68 2145.67,1082.68 2303.15,925.2 2503.93,925.2 2515.75,937.01 2531.5,937.01 2543.31,925.2 2645.67,925.2 2685.03,885.83 v1@2787.41,885.83
SRAM2_NOE: U4.AB25 U9.41 | length 576.6
  Top Layer w5: U4.AB25@1976.38,1137.8 1996.06,1118.11 2023.62,1118.11 2047.24,1094.49 2047.24,1086.61 2055.12,1078.74 2078.74,1078.74 2090.55,1078.74 2118.11,1078.74 2165.35,1031.5 2165.35,980.32 2322.84,822.83 U9.41@2387.89,822.83
SRAM2_NWE: U4.U23 U9.17 | length 1014.1
  Top Layer w5: v1(2759.84,1232.28) U9.17@2836.71,1232.28
  Top Layer w7.87: U4.U23@1897.64,1334.65 v1(1917.32,1314.96)
  MidLayer1 w5: v1(1917.32,1314.96) 1937.01,1334.64 2051.18,1334.64 2078.74,1334.65 2094.49,1334.65 2244.09,1334.65 2350.39,1228.35 2523.61,1228.35 2539.36,1212.61 2555.11,1212.61 2574.79,1232.29 v1(2759.84,1232.28)
STATUS_LED: NT2.1 U2.2 | length 74.7
  Bottom Layer w5: U2.2@1397.64,207.68 U2.2@1397.64,220.47 1397.64,251.97 1404.53,258.86 NT2.1@1425.2,258.86
SW0: HDR_B1.42 U4.AB8 | length 944.4
  Top Layer w7.87: v1(1287.4,1118.11) U4.AB8@1307.09,1137.8
  MidLayer2 w5: v1(1287.4,1118.11) 1267.72,1098.42 1267.72,996.06 1287.4,976.38 1287.4,917.32 1287.4,905.51 1287.4,814.96 1346.46,755.91 1535.43,755.91 1570.87,720.47 1716.54,720.47 1751.97,685.04 v2(1751.97,665.35)
  Bottom Layer w7.87: HDR_B1.42@1751.97,606.3 v2(1751.97,665.35)
SW1: HDR_B1.44 U4.AB9 | length 927.3
  Top Layer w7.87: v1(1326.77,1118.11) U4.AB9@1346.46,1137.8
  MidLayer2 w5: v1(1326.77,1118.11) 1307.09,1098.42 1307.09,917.32 1307.09,905.51 1307.09,901.57 1342.52,866.14 1342.52,818.9 1362.2,799.21 1559.06,799.21 1625.98,732.28 1740.16,732.28 v2(1783.46,688.98)
  Bottom Layer w7.87: HDR_B1.44@1783.47,606.3 v2(1783.46,688.98)
SW2: HDR_B1.46 U4.AB10 | length 907.9
  Top Layer w7.87: v1(1366.14,1118.11) U4.AB10@1385.83,1137.8
  MidLayer2 w5: v1(1366.14,1118.11) 1346.46,1098.42 1346.46,1011.81 1366.14,992.13 1366.14,917.32 1366.14,905.51 1366.14,858.27 1385.83,838.58 1547.24,838.58 1641.73,744.09 1763.78,744.09 1814.96,692.91 v2(1814.96,665.35)
  Bottom Layer w7.87: HDR_B1.46@1814.96,606.3 v2(1814.96,665.35)
SW3: HDR_B1.48 U4.AB11 | length 890.8
  Top Layer w7.87: v1(1405.51,1118.11) U4.AB11@1425.2,1137.8
  MidLayer2 w5: v1(1405.51,1118.11) 1385.83,1098.42 1385.83,917.32 1385.83,905.51 1385.83,889.76 1397.64,877.95 1531.5,877.95 1653.54,755.91 1779.53,755.91 v2(1846.46,688.98)
  Bottom Layer w7.87: HDR_B1.48@1846.46,606.3 v2(1846.46,688.98)
SW4: HDR_B1.50 U4.AB12 | length 873.7
  Top Layer w7.87: v1(1444.88,1118.11) U4.AB12@1464.57,1137.8
  MidLayer2 w5: v1(1444.88,1118.11) 1425.2,1098.42 1425.2,917.32 1425.2,905.51 1425.2,901.57 1429.13,897.64 1535.43,897.64 1665.35,767.72 1795.28,767.72 1877.95,685.04 v2(1877.95,665.35)
  Bottom Layer w7.87: HDR_B1.50@1877.96,606.3 v2(1877.95,665.35)
TCK: R7.2 U4.B24 | length 226.3
  Top Layer w5: U4.B24@1937.01,1925.2 1956.69,1944.88 1956.69,1980.32 1992.13,2015.75 2027.56,2015.75 2047.24,2035.43 v1(2047.24,2055.12)
  Bottom Layer w5: v1(2047.24,2055.12) R7.2@2047.24,2085.12
TDI: R10.2 U4.C1 | length 301.1
  Top Layer w5: v1(1014.76,2059.06) 1014.76,2041.34 973,1999.57 973,1928.57 1015.75,1885.83 U4.C1@1031.5,1885.83
  Bottom Layer w5: R10.2@963.07,2094.48 963.07,2076.3 980.61,2058.76 v1(1014.76,2059.06)
TDO: R8.2 U4.D24 | length 261.3
  Top Layer w7.87: U4.D24@1937.01,1846.46 v1(1956.69,1866.14)
  MidLayer1 w5: v1(1956.69,1866.14) 2015.75,1925.2 2059.06,1925.2 v1(2082.68,1948.82)
  Bottom Layer w5: v1(2082.68,1948.82) 2082.68,1955.19 R8.2@2129.92,2002.44
TMS: R6.2 U4.A24 | length 134.5
  Top Layer w5: U4.A24@1937.01,1964.57 1937.01,1984.25 1968.5,2015.75 v1(1968.5,2055.12)
  Bottom Layer w5: R6.2@1964.57,2085.12 R6.2@1964.78,2084.23 ; v1(1968.5,2055.12) R6.2@1968.5,2085.11
TOFF: R23.1 U5.7 | length 159.5
  Top Layer w15.75: U5.7@2824.58,1783.25 2824.8,1783.46 2874.02,1783.46 2905.51,1814.96 R23.1@2970.94,1814.96
UGCLK0: U4.B13
UGCLK1: U4.AE13 | length 112.1
  Top Layer w5: 1488.19,917.32 1488.19,960.63 1484.25,964.57 1484.25,1000 U4.AE13@1503.94,1019.68
UGCLK2: U4.AD13 | length 149.9
  Top Layer w7.87: v1(1484.25,1039.37) U4.AD13@1503.94,1059.05
  MidLayer1 w5: 1484.25,917.32 v1(1484.25,1039.37)
VFILT: C117.1 C118.1 R19.2 U5.5 U5.12 | length 544.3
  Top Layer w15.75: R19.2@2492.12,1643.23 2492.12,1688.98 C118.1@2488.18,1692.91 2488.19,1716.54 2504.9,1733.25 U5.12@2592.58,1733.25 ; U5.12@2592.58,1733.25 U5.5@2824.58,1733.25 2904.53,1733.27 2918.31,1719.48 C117.1@2944.88,1719.48
VSET: R18.1 R25.1 U6.5 | length 153
  Top Layer w5: R18.1@1847.95,2358.26 1870.07,2358.26 1875.51,2363.7 1875.51,2462.12 1881.89,2468.5 U6.5@1897.64,2468.5
pads on no net: HDR_B1.93 HDR_B1.95 HDR_B1.MH5 HDR_B1.MH6 HDR_L1.MH5 HDR_L1.MH6 HDR_T1.95 HDR_T1.MH5 HDR_T1.MH6 MH1.MOUNT MH2.MOUNT MH3.MOUNT U1.5 U2.1 U3.A1 U3.A8 U3.B1 U3.B4 U3.C1 U3.D1 U3.E1 U3.F8 U3.G1 U3.G8 U3.H1 U3.H8 U4.A3 U4.A4 U4.A5 U4.A6 U4.A7 U4.AA3 U4.AA5 U4.AA21 U4.AA22 U4.AB13 U4.AB22 U4.AC22 U4.AD1 U4.AD2 U4.AE7 U4.AF7 U4.B3 U4.B5 U4.B6 U4.B7 U4.B14 U4.B18 U4.C25 U4.C26 U4.D5 U4.D14 U4.D22 U4.D25 U4.D26 U4.E5 U4.E9 U4.E16 U4.E22 U4.F5 U4.F6 U4.F7 U4.F22 U4.FID1 U4.G6 U4.G9 U4.G10 U4.G11 U4.G12 U4.G13 U4.G14 U4.G15 U4.G16 U4.G25 U4.H6 U4.H20 U4.J6 U4.K23 U4.N20 U4.N22 U4.N23 U4.N26 U4.P20 U4.R20 U4.T20 U4.T21 U4.U20 U4.U21 U4.U22 U4.V2 U4.V20 U4.V21 U4.V22 U4.W12 U4.W20 U4.W21 U4.W22 U4.Y4 U7.40 U8.40
copper on no net: | length 12274.4
  Top Layer w5: 968.5,1275.59 1051.18,1275.59 1070.87,1295.28 ; 998,1039.37 1051.18,1039.37 1070.87,1059.05 ; 998,1059.05 1031.5,1059.05 ; 1070.87,2027.56 1070.87,2005.91 1090.55,1986.22 1090.55,1944.88 1110.24,1925.2 ; 1082.68,2027.56 1082.68,2011.81 1110.24,1984.25 1110.24,1964.57 ; 1149.61,1964.57 1149.61,1981.91 1149.61,2003.9 ; 1169.29,2003.9 1169.29,1944.88 1188.98,1925.2 ; 1188.98,1964.57 1188.98,1984.25 1192.91,1988.19 1192.91,2027.56 ; 1204.72,2027.56 1204.72,1988.19 1208.66,1984.25 1208.66,1980.32 1208.66,1948.82 1208.66,1944.88 1228.35,1925.2 ; 1216.54,2027.6 1216.54,1996.06 1228.35,1984.25 1228.35,1964.57 ; 1228.35,2027.4 1228.35,2000 1248.03,1980.32 1248.03,1944.88 1267.72,1925.2 ; 1248.03,975.3 1248.03,1000 1267.72,1019.68 ; 1267.72,950.5 1267.72,980.31 ; 1700.79,1925.2 1720.47,1944.88 1720.47,2027.56 ; 1976.38,1728.35 1996.06,1748.03 2031.5,1748.03 2051.18,1767.72 2078.74,1767.72 ; 1976.38,1846.46 1996.06,1866.14 2078.74,1866.14 ; 1976.38,1885.83 1996.06,1905.51 2066.93,1905.51 ; 2015.75,1492.13 2078.74,1492.13 ; 2015.75,1846.46 2035.43,1846.46 2055.12,1826.77 2078.74,1826.77 ; 2015.75,1885.83 2090.55,1885.83
  Top Layer w7.87: v1(1090.55,1157.48) 1110.24,1177.17 ; v1(1129.92,1196.85) 1149.61,1216.54 ; v1(1169.29,1787.4) 1188.98,1767.72 ; v1(1169.29,1826.77) 1188.98,1807.09 ; v1(1169.29,1866.14) 1188.98,1846.46 ; v1(1208.66,1669.29) 1228.35,1649.61 ; v1(1208.66,1708.66) 1228.35,1688.98 ; v1(1208.66,1748.03) 1228.35,1728.35 ; v1(1208.66,1787.4) 1228.35,1767.72 ; v1(1248.03,1787.4) 1267.72,1767.72 ; v1(1326.77,1748.03) 1346.46,1728.35 ; v1(1326.77,1826.77) 1346.46,1807.09 ; v1(1366.14,1748.03) 1385.83,1728.35 ; v1(1405.51,1748.03) 1425.2,1728.35 ; v1(1444.88,1236.22) 1464.57,1255.91 ; v1(1444.88,1748.03) 1464.56,1728.35 ; v1(1484.25,1118.11) 1503.94,1137.79 ; v1(1484.25,1749.02) 1503.94,1728.35 ; 1543.31,1728.35 v1(1562.99,1749.02) ; 1543.31,1846.46 v1(1562.99,1866.14) ; 1582.68,1728.35 v1(1602.36,1748.03) ; 1622.05,1728.35 v1(1641.73,1748.03) ; 1622.05,1807.09 v1(1641.73,1826.77) ; 1779.53,1255.91 v1(1799.21,1236.22) ; 1779.53,1295.28 v1(1799.21,1275.59) ; 1779.53,1334.65 v1(1799.21,1314.96) ; 1779.53,1374.02 v1(1799.21,1354.33) ; 1779.53,1413.39 v1(1799.21,1393.7) ; 1779.53,1452.76 v1(1801.18,1433.07) ; 1779.53,1492.13 v1(1801.18,1511.81) ; 1779.53,1688.98 v1(1799.21,1708.66) ; 1818.9,1177.17 v1(1838.58,1157.48) ; 1818.9,1255.91 v1(1838.58,1236.22) ; 1818.9,1295.28 v1(1838.58,1275.59) ; 1818.9,1334.65 v1(1838.58,1314.96) ; 1818.9,1374.02 v1(1838.58,1354.33) ; 1858.27,1098.42 v1(1877.95,1078.74) ; 1858.27,1137.79 v1(1877.95,1118.11) ; 1858.27,1177.17 v1(1877.95,1157.48) ; 1858.27,1255.91 v1(1877.95,1236.22) ; 1858.27,1295.28 v1(1877.95,1275.59) ; 1858.27,1334.65 v1(1877.95,1314.96) ; 1858.27,1492.13 v1(1877.95,1511.81) ; 1858.27,1807.09 v1(1877.95,1826.77) ; 1858.27,1846.46 v1(1877.95,1866.14) ; 1897.64,1492.13 v1(1917.32,1511.81) ; 1897.64,1610.24 v1(1917.32,1629.92) ; 3149.61,4212.6 3149.61,4330.71
  MidLayer1 w5: 968.5,1157.48 v1(1090.55,1157.48) ; 968.5,1177.17 1110.24,1177.17 v1(1129.92,1196.85) ; 1149.61,1921.26 1149.61,1885.83 v1(1169.29,1866.14) ; v1(1877.95,1078.74) 1897.64,1059.05 1897.64,988.19 1905.51,980.32 1905.51,917.32 ; v1(1877.95,1866.14) 1897.64,1885.83 1897.64,1921.26 ; v1(1917.32,1511.81) 1937.01,1492.13 1968.5,1492.13 1976.38,1500 2078.74,1500 ; v1(1917.32,1629.92) 1937.01,1610.24 2051.18,1610.24 2078.74,1610.24
  MidLayer2 w5: 1307.09,2027.56 1307.09,1846.46 v1(1326.77,1826.77) ; v1(1444.88,1236.22) 1464.57,1216.53 1464.57,1019.68 1464.57,917.32 ; v1(1484.25,1118.11) 1503.94,1098.42 1503.94,917.32 ; v1(1641.73,1826.77) 1661.42,1846.46 1661.42,2027.56 ; v1(1877.95,1118.11) 1897.64,1098.42 2066.93,1098.42 ; v1(1877.95,1157.48) 1897.64,1137.8 2078.74,1137.8 2082.68,1137.8 ; v1(1877.95,1236.22) 1897.64,1216.54 2078.74,1216.54 ; v1(1877.95,1275.59) 1897.64,1255.91 2078.74,1255.91 ; v1(1877.95,1314.96) 1897.64,1295.28 2000,1295.28 ; v1(1877.95,1511.81) 1897.64,1492.13 2078.74,1492.13 ; v1(1877.95,1826.77) 1897.64,1846.46 2074.8,1846.46
  MidLayer3 w5: 968.5,1688.98 1188.97,1688.98 v1(1208.66,1669.29) ; 1078.8,1807 1149.69,1807 v1(1169.29,1787.4) ; 1080.8,1768 1189.26,1768 v1(1208.66,1787.4) ; v1(1169.29,1826.77) 1189,1846.48 1189,1909.6 ; 1228.35,2027.56 1228.34,1807.09 v1(1248.03,1787.4) ; v1(1838.58,1157.48) 1858.27,1137.79 1858.27,1082.68 1858.27,988.19 1874.02,972.44 1874.02,917.32 ; v1(1838.58,1236.22) 1858.27,1216.54 2078.74,1216.54 ; v1(1838.58,1275.59) 1858.27,1255.9 2078.74,1255.91 ; v1(1838.58,1314.96) 1858.27,1295.28 1968.5,1295.28 1992.13,1271.65 2078.74,1271.65 ; v1(1838.58,1354.33) 1858.27,1334.65 2078.74,1334.65
  MidLayer4 w5: 1385.82,2027.56 1385.82,1917.32 1385.83,1763.78 v1(1405.51,1748.03) ; 1425.19,2027.56 1425.19,1937.01 1425.19,1767.72 v1(1444.88,1748.03) ; 1464.57,2027.56 1464.57,1767.72 v1(1484.25,1749.02) ; 1484.25,2027.56 1484.25,1944.88 v1(1562.99,1866.14) ; v1(1562.99,1749.02) 1582.68,1767.72 1582.68,2027.56 ; v1(1602.36,1748.03) 1622.05,1767.72 1622.05,2027.56 ; v1(1641.73,1748.03) 1661.42,1763.78 1661.42,1917.32 1661.42,1937.01 1661.42,2027.56 ; v1(1799.21,1236.22) 1818.9,1216.53 2003.94,1216.53 ; v1(1799.21,1275.59) 1818.9,1255.9 2078.74,1255.9 ; v1(1799.21,1314.96) 1818.9,1295.28 1984.25,1295.28 2003.94,1275.59 2078.74,1275.59 ; v1(1799.21,1354.33) 1814.96,1334.65 1968.5,1334.64 2078.74,1334.64 ; v1(1799.21,1393.7) 1818.9,1374.01 2078.74,1374.01 ; v1(1801.18,1433.07) 1818.9,1413.38 2078.74,1413.39 ; v1(1801.18,1511.81) 1818.9,1531.5 2078.74,1531.5
  other v1: 1618.11,43.31 1456.69,59.06 1771.65,59.06 1556.86,68.68 1679.36,68.68 1531.5,129.92 1704.72,129.92 1556.86,191.17 1679.36,191.17 1618.11,216.54 129.92,4240.16 3106.3,4240.16 68.68,4265.53 191.17,4265.53 3045.05,4265.53 3167.54,4265.53 43.31,4326.77 216.54,4326.77 3019.68,4326.77 3192.91,4326.77 68.68,4388.02 191.17,4388.02 3045.05,4388.02 3167.54,4388.02 129.92,4413.39 3106.3,4413.39

## Polygon pours and split planes (outlines as drawn)
2V5 on Top Layer "2V5-TOP-CAP" (solid, remove dead copper, pour order 1011): 866.14,795.28 1066.93,795.28 1066.93,1011.81 866.14,1011.81
AGND on Top Layer "AGND-TOP" (solid, remove dead copper, pour order 1003): 2377.61,2077.57 2377.61,1677.17 3088.3,1677.17 3088.3,2077.57
GND on Top Layer "GROUND-TOP-LAYER" (solid, remove dead copper, pour order 1012): 19.68,4132.62 298.72,4132.62 298.72,4409.45 2929.63,4409.45 2929.63,4132.62 3208.66,4132.62 3208.66,19.68 1813.48,19.68 1813.48,296.52 1414.86,296.52 1414.86,19.68 19.68,19.68
1V2 on MidLayer1 "1V2-connect-to-L1-C17" (solid, remove dead copper, pour order 1001): 2275.59,1417.32 3165.35,1417.32 3165.35,2200.79 2621.61,2200.79 2621.61,1691.54 2275.59,1691.54
1V2 on MidLayer1 "FPGAPWR-ML1-1V2" (solid, pour order 1000): 1472.13,1854.02 1472.13,2027.56 1574.8,2027.56 1574.8,1850.39 1811.02,1850.39 1901.57,1759.84 1901.57,1519.69 2078.74,1519.69 2078.74,1421.26 1901.57,1421.26 1901.57,1185.04 1811.02,1094.49 1574.8,1094.49 1574.8,917.32 1472.44,917.32 1472.44,1094.49 1236.22,1094.49 1145.67,1185.04 1145.67,1421.26 968.5,1421.26 968.5,1523.62 1145.67,1523.62 1145.67,1767.72 1228.35,1850.39
GND on MidLayer1 "GROUND-MID1-LAYER" (solid, remove dead copper, pour order 1013): 19.68,4132.62 298.72,4132.62 298.72,4409.45 2929.63,4409.45 2929.63,4132.62 3208.66,4132.62 3208.66,19.68 1813.48,19.68 1813.48,296.52 1414.86,296.52 1414.86,19.68 19.68,19.68
2V5 on MidLayer2 "2V5" (solid, remove dead copper, pour order 1002): 2409.45,2322.83 3051.18,2322.83 3051.18,137.8 2409.45,137.8
GND on MidLayer2 "GROUND-MID2-LAYER" (solid, remove dead copper, pour order 1014): 19.68,4132.62 298.72,4132.62 298.72,4409.45 2929.63,4409.45 2929.63,4132.62 3208.66,4132.62 3208.66,19.68 1813.48,19.68 1813.48,296.52 1414.86,296.52 1414.86,19.68 19.68,19.68
GND on MidLayer3 "GROUND-MID3-LAYER" (solid, remove dead copper, pour order 1015): 19.68,4132.62 298.72,4132.62 298.72,4409.45 2929.63,4409.45 2929.63,4132.62 3208.66,4132.62 3208.66,19.68 1813.48,19.68 1813.48,296.52 1414.86,296.52 1414.86,19.68 19.68,19.68
GND on MidLayer4 "GROUND-MID4-LAYER" (solid, remove dead copper, pour order 1016): 19.68,4132.62 298.72,4132.62 298.72,4409.45 2929.63,4409.45 2929.63,4132.62 3208.66,4132.62 3208.66,19.68 1813.48,19.68 1813.48,296.52 1414.86,296.52 1414.86,19.68 19.68,19.68
GND on Bottom Layer "GROUND-BOTTOM-LAYER" (solid, remove dead copper, pour order 1017): 8.88,4109.82 287.92,4109.82 287.92,4386.65 2918.83,4386.65 2918.83,4109.82 3197.86,4109.82 3197.86,-3.12 1802.68,-3.12 1802.68,273.72 1404.06,273.72 1404.06,-3.12 8.88,-3.12
2V5 on Bottom Layer "GAPWR-BL-2V5E" (solid, remove dead copper, pour order 1010): 1417.32,2224.41 1417.32,2027.56 1992,2027.56 1992,2026.17 2072.64,1948.82 2074.09,1947.43 2074.09,1791.34 2669.29,1791.34 2648.77,1811.02 2648.77,2303.15 2546.15,2303.15 2546.15,2224.41
3V3 on Bottom Layer "FPGAPWR-BL-3V3" (solid, pour order 1004): 1500,1405.51 1547.24,1405.51 1590.55,1448.82 1590.55,1496.06 1547.24,1539.37 1500,1539.37 1456.69,1496.06 1456.69,1448.82
1V2 on Bottom Layer "FPGAPWR-BL-1V2" (solid, pour order 1005): 1748.03,1913.39 1940.94,1724.41 1940.94,1224.41 1771.65,1055.12 1275.59,1055.12 1106.3,1224.41 1106.3,1724.41 1299.21,1913.39
2V5 on Bottom Layer "FPGAPWR-BL-2V5C" (solid, remove dead copper, pour order 1008): 2232.28,2100.97 2232.28,851.78 2129.65,791.34 2095.44,791.34 1984.25,871.93 1984.25,2080.82 2095.44,2161.42 2129.65,2161.42
2V5 on Bottom Layer "FPGAPWR-BL-2V5A" (solid, remove dead copper, pour order 1006): 910.66,2224.41 2156.26,2224.41 2216.54,2103.86 2216.54,2063.67 2136.17,1933.07 930.76,1933.07 850.39,2063.67 850.39,2103.86
2V5 on Bottom Layer "FPGAPWR-BL-2V5D" (solid, remove dead copper, pour order 1009): 846.46,2157.25 846.46,850.63 936.06,787.4 965.92,787.4 1062.99,871.7 1062.99,2136.17 965.92,2220.47 936.06,2220.47
2V5 on Bottom Layer "FPGAPWR-BL-2V5B" (solid, remove dead copper, pour order 1007): 2156.09,779.53 906.9,779.53 846.46,875.64 846.46,907.68 927.05,1011.81 2135.94,1011.81 2216.54,907.68 2216.54,875.64
GND on GND-Layer5 (split plane): 1523.62,4436.6 3216.12,4436.6 3216.12,20.1 20.1,20.1 20.1,4436.6 1523.62,4436.6
3V3 on VCC (split plane): 1523.62,4436.6 2701.84,4436.6 2701.84,4061.24 2702.17,4058.67 2703.17,4056.27 2704.74,4054.22 2720.98,4037.98 2721.87,4037.3 2723.04,4036.4 2725.43,4035.41 2728,4035.07 3041.89,4035.07 3106.07,3970.89 3106.07,2319.11 3064.6,2277.64 2921.43,2277.64 2802.3,2396.78 2800.24,2398.36 2797.84,2399.35 2795.28,2399.69 2629.92,2399.69 2627.35,2399.35 2624.96,2398.36 2622.9,2396.78 2617,2390.88 2615.42,2388.82 2614.43,2386.43 2614.09,2383.86 2614.09,2206.87 2429.99,2022.77 2428.41,2020.71 2427.42,2018.32 2427.08,2015.75 2427.08,1590.55 2427.42,1587.98 2428.41,1585.59 2429.99,1583.53 2445.74,1567.78 2447.79,1566.21 2450.19,1565.21 2452.76,1564.88 2582.68,1564.88 2585.25,1565.21 2587.64,1566.21 2589.7,1567.78 2618.29,1596.37 2712.19,1596.37 2725.07,1583.49 2725.07,1440 2725.41,1437.43 2726.4,1435.04 2727.98,1432.98 2732.98,1427.98 2735.04,1426.4 2737.43,1425.41 2740,1425.07 3005.77,1425.07 3045.19,1385.65 3045.19,1287.4 3045.19,1244.09 3045.19,795.45 2948.64,698.9 2838.58,698.9 2836.01,698.57 2833.62,697.57 2831.56,696 2780.38,644.82 2778.8,642.76 2777.81,640.36 2777.47,637.8 2777.47,523.8 2617,363.32 2615.42,361.26 2614.43,358.87 2614.09,356.3 2614.09,20.1 20.1,20.1 20.1,4436.6 1523.62,4436.6
5V0 on VCC (split plane): 3216.12,4436.6 3216.12,20.1 2633.94,20.1 2633.94,352.19 2794.42,512.67 2796,514.72 2796.99,517.12 2797.33,519.68 2797.33,633.68 2842.69,679.05 2952.76,679.05 2955.33,679.39 2957.72,680.38 2959.78,681.96 3062.14,784.32 3063.03,785.48 3063.72,786.37 3064.01,787.08 3064.71,788.77 3065.05,791.34 3065.05,1244.09 3065.05,1287.4 3065.05,1389.76 3064.71,1392.33 3063.72,1394.73 3062.82,1395.89 3062.14,1396.78 3016.9,1442.02 3014.85,1443.6 3012.45,1444.59 3009.88,1444.93 2744.93,1444.93 2744.93,1587.6 2744.59,1590.17 2743.6,1592.56 2742.02,1594.62 2723.32,1613.32 2721.26,1614.9 2718.87,1615.89 2716.3,1616.23 2614.17,1616.23 2611.6,1615.89 2609.21,1614.9 2607.15,1613.32 2578.57,1584.73 2456.87,1584.73 2446.94,1594.66 2446.94,2011.64 2631.04,2195.74 2632.61,2197.79 2633.6,2200.19 2633.94,2202.76 2633.94,2379.75 2634.03,2379.84 2791.16,2379.84 2910.3,2260.7 2911.2,2260.01 2912.36,2259.12 2914.75,2258.13 2917.32,2257.79 3068.72,2257.79 3071.29,2258.13 3073.68,2259.12 3075.74,2260.7 3123.02,2307.98 3124.6,2310.04 3125.59,2312.43 3125.93,2315 3125.93,3975 3125.59,3977.57 3124.6,3979.96 3123.7,3981.13 3123.02,3982.02 3053.02,4052.02 3050.96,4053.6 3048.57,4054.59 3046,4054.93 2732.11,4054.93 2721.69,4065.35 2721.69,4436.6

## Keep-outs
Bottom Layer:
  rectangle: 2643.7,3334.65 2840.55,3417.32
Keep-Out Layer:
  circle w15.75: c2928.82,472.44 r118.11
  circle w15.75: c857.95,472.44 r118.11
  circle w15.75: c306.77,437.01 r118.11
  circle w15.75: c306.77,2507.87 r118.11
  circle w15.75: c857.95,2472.44 r118.11
  circle w15.75: c2928.82,2472.44 r118.11
  region: 3236.22,4456.69 3212.6,4456.69 3212.6,0 3236.22,0
  rectangle: 0,0 23.62,4456.69
  rectangle: 0,0 3236.22,23.62
  region: 0,4456.69 0,4433.07 3236.22,4433.07 3236.22,4456.69
Mechanical 4:
  rectangle: 236.22,4358.27 925.2,4456.69

## Other copper
Top Layer:
  rectangle net GND: 3093.5,1773.6 3142.6,1785.4
  rectangle net GND: 2645.67,2551.18 2740.16,2692.91
  rectangle net 5V0: 2645.67,2251.97 2740.16,2393.7
  region net LX: 2768.7,1716.54 2645.67,1716.54 2645.67,1622.32 2768.7,1622.32
  rectangle net 1V2: 2850.39,2100 3027.56,2195
  rectangle net AGND: 2515.6,1915.2 2523.6,1942.4
  rectangle net 5V0: 2885.41,1479.25 3016.97,1700.34
  rectangle net 5V0: 2807.08,1449.65 2955.14,1558.01
  rectangle net GND: 3011.81,1366.15 3031.49,1405.52
  pour cut-out: 2554.02,3195 2554.02,2865 2194.02,2865 2194.02,3195
  pour cut-out: 995.43,2007.56 2055.43,2007.56 2055.43,947.56 995.43,947.56
MidLayer4:
  rectangle net 5V0: 2625,2240 2755,2370
Bottom Layer:
  rectangle net GND: 2645.67,598.43 2740.16,696.85
  rectangle net 5V0: 2645.67,251.97 2740.16,346.46
  rectangle net GND: 2645.67,2598.43 2740.16,2696.85
  rectangle net 3V3: 1501.97,1405.51 1545.28,1433.07
  region net 3V3: 1590.55,1452.76 1590.55,1492.13 1562.99,1492.13 1562.99,1452.76
  region net 3V3: 1590.55,1450.79 1590.55,1494.09 1562.99,1494.09 1562.99,1450.79
  region net 3V3: 1545.28,1539.37 1501.97,1539.37 1501.97,1511.81 1545.28,1511.81
  region net 3V3: 1456.69,1494.09 1456.69,1450.79 1484.25,1450.79 1484.25,1494.09
  rectangle net 3V3: 2562.99,570.86 2610.24,704.72
  rectangle net 3V3: 2562.99,2570.86 2610.24,2704.72
  rectangle net 5V0: 2645.67,2248.03 2740.16,2346.46
  rectangle net 5V0: 2629.92,2248.03 2740.16,2346.46
  rectangle net LX: 2637.8,1618.11 2799.21,1728.35
  rectangle net 1V2: 2850.39,1972.44 3027.56,2192.91
  region net LX: 2455.79,1920.32 2455.79,2040.32 2305.79,2040.32 2305.79,1920.32
  rectangle net 1V2: 2641.13,1901.74 2787.4,2043.82
  region net GND: 1503.94,1724.41 1503.94,1771.65 1523.62,1791.34 1543.31,1771.65 1543.31,1720.47 1503.94,1720.47
  region net GND: 1775.59,1492.13 1822.83,1492.13 1842.52,1472.44 1822.83,1452.76 1771.65,1452.76 1771.65,1492.13
  region net GND: 1543.31,1220.47 1543.31,1173.23 1523.62,1153.54 1503.94,1173.23 1503.94,1224.41 1543.31,1224.41
  region net GND: 1271.65,1452.76 1224.41,1452.76 1204.72,1472.44 1224.41,1492.13 1275.59,1492.13 1275.59,1452.76
GND-Layer5 (plane layer: these items are gaps in the copper):
  rectangle: 2645.67,2251.97 2740.16,2283.47
  rectangle: 2708.66,2251.97 2740.16,2346.46
  rectangle: 2570.87,661.42 2602.37,724.41
  rectangle: 2708.66,314.96 2740.16,346.46
  rectangle: 2645.67,251.97 2708.66,283.46
  rectangle: 2570.87,2661.42 2602.36,2724.41
  text "GND" at 1645.67,437.01 h60
VCC (plane layer: these items are gaps in the copper):
  lines w19.68: 2624.02,0 2624.02,356.3 2787.4,519.68 2787.4,637.8 2838.58,688.98 2952.76,688.98 3055.12,791.34 3055.12,1244.09 3055.12,1287.4 3055.12,1389.76 3009.88,1435 2740,1435 2735,1440 2735,1587.6 2716.3,1606.3 2614.17,1606.3 2582.68,1574.8 2452.76,1574.8 2437.01,1590.55 2437.01,2015.75 2624.02,2202.76 2624.02,2383.86 2629.92,2389.76 2795.28,2389.76 2917.32,2267.72 3068.72,2267.72 3116,2315 3116,3975 3046,4045 2728,4045 2711.76,4061.24 2711.76,4456.69
  text "5V0" at 2791.34,1826.77 h60
  text "3V3" at 1657.48,437.01 h60